# Altium PCB PCB_USB_ISOLATOR.PcbDoc
Units mm, origin at the board's own origin, x right, y up, seen from the top; angles counter-clockwise.
Board outline 66.68 x 24.66 mm, 2 copper layers (Top Layer, Bottom Layer); 30 components, 17 nets, 183 pads, 0 vias.
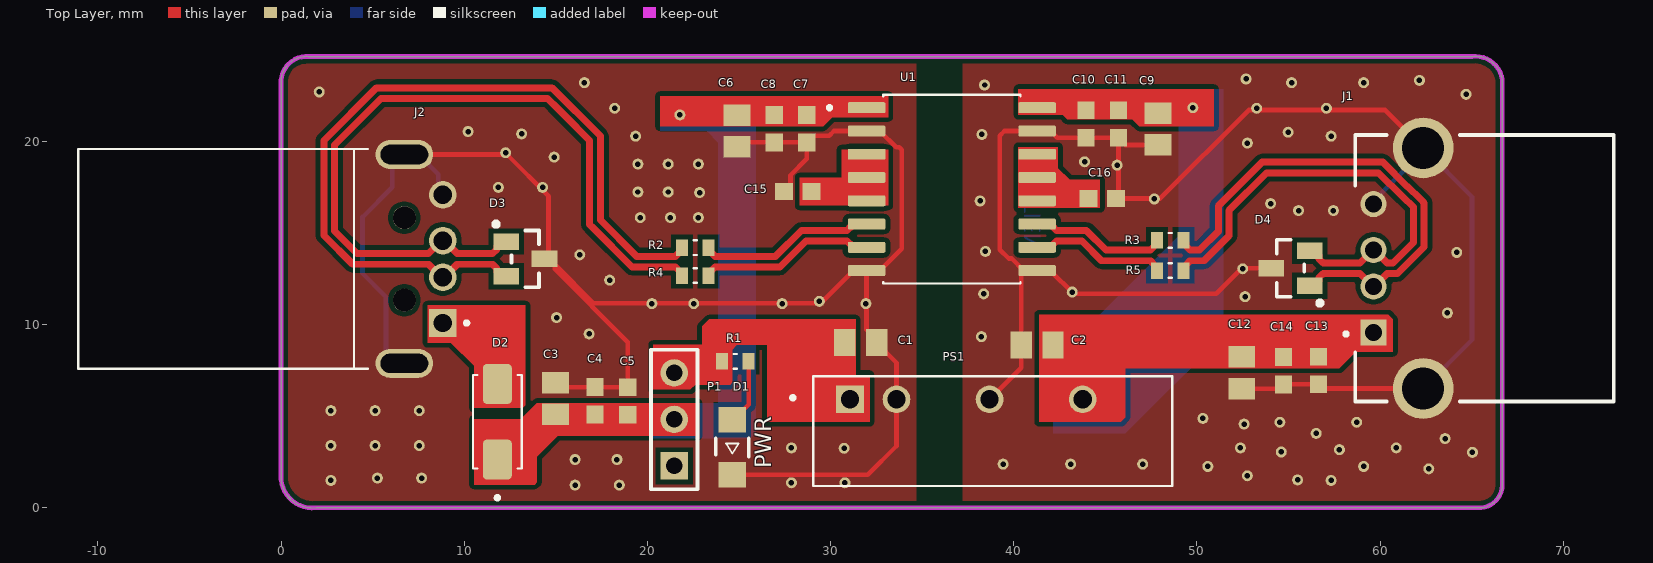
[diagram p0: Top Layer view]
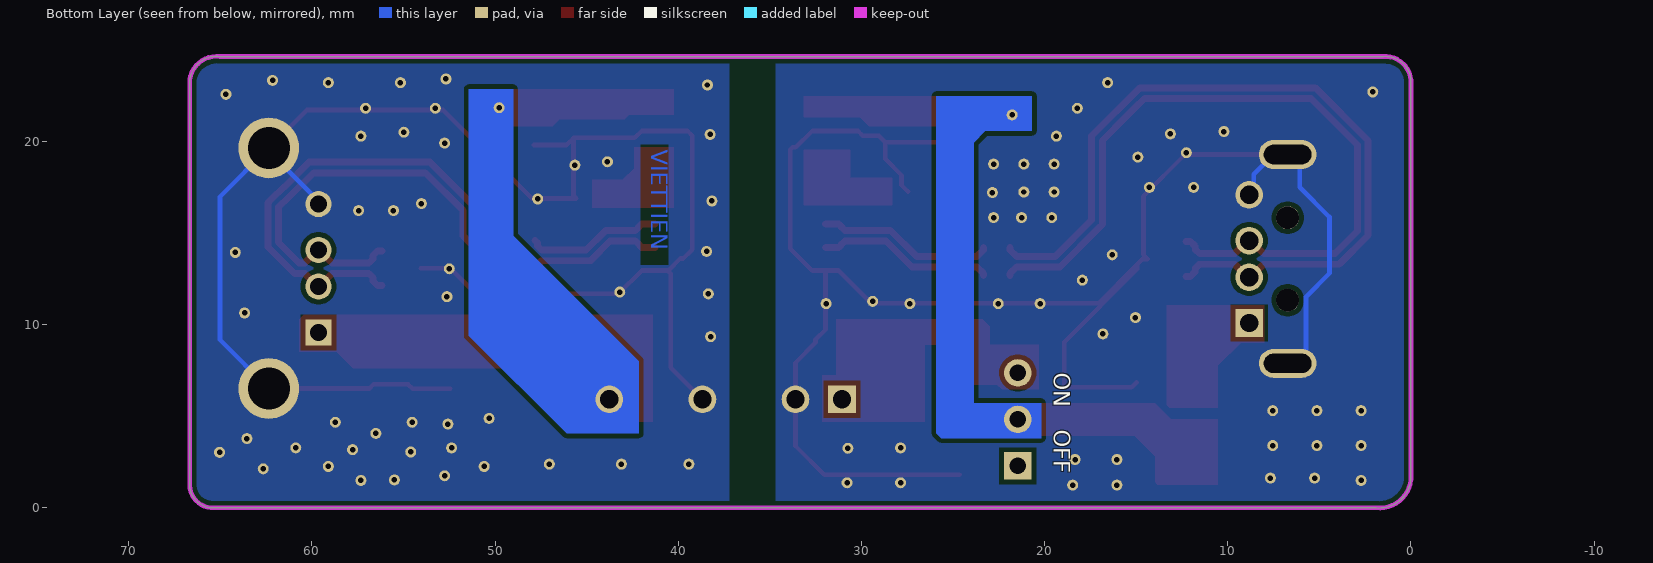
[diagram p1: Bottom Layer view, seen from below]
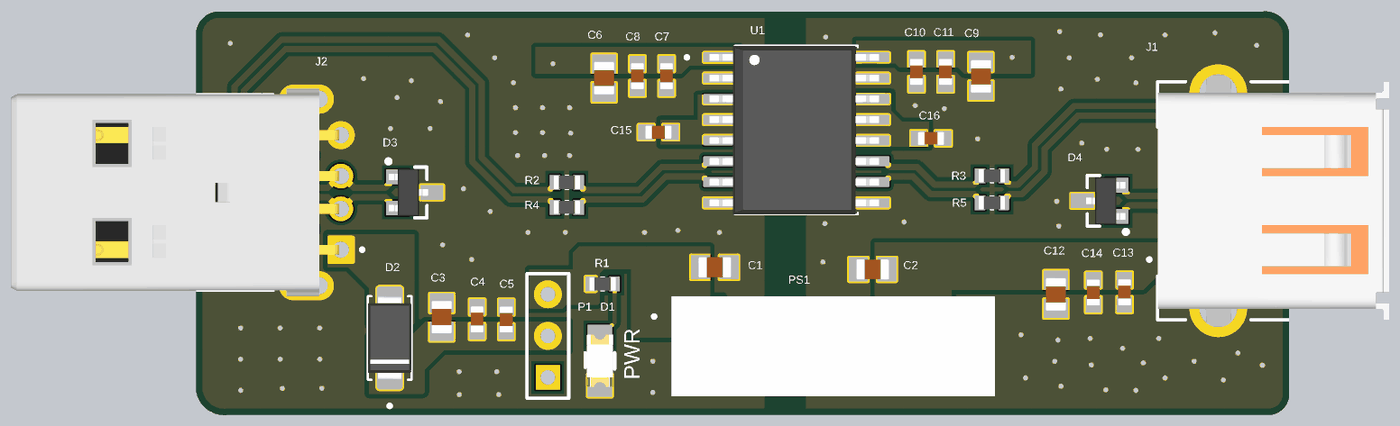
[diagram p2: 3D render of the assembled board from above, using the file's embedded part models]

## Layer stack, top to bottom
Top Solder: solder mask 0.0102, Solder Resist, Dk 3.5
Top Layer: signal copper 0.0356
Dielectric 1: dielectric 0.32, FR-4, Dk 4.8
Bottom Layer: signal copper 0.0356
Bottom Solder: solder mask 0.0102, Solder Resist, Dk 3.5

## Board outline
0,1.524 0,23.368 cw(c1.397,23.241) 1.524,24.638 65.024,24.638 cw(c65.214,23.177) 66.675,23.368 66.675,1.397 cw(c65.405,1.27) 65.532,0 1.905,0 cw(c1.714,1.714)

## Design rules (kind name [scope] priority, off if disabled: settings)
Clearance [All] p1: gap=0.254 ignorepadtopadclearanceinfootprint=FALSE except(0: Arc-Hole Track-Hole SMDPad-Hole THPad-Hole Via-Hole Fill-Hole Poly-Hole Region-Hole Text-Hole; 0.154: Arc-Arc Arc-Track Track-Track)
DiffPairsRouting [All] p1: maxlimit=0.5 minlimit=0.15 mostfreqgap=0.2 toplayer_minwidth=0.15 toplayer_maxwidth=0.389 toplayer_prefwidth=0.389 bottomlayer_minwidth=0.15 bottomlayer_maxwidth=0.389 bottomlayer_prefwidth=0.389 impedanceprofiledriven=TRUE impedanceprofileid={421DD26A-4B10-4B7B-B98A-467E2CAEE926} impedanceprofilevalue=90.000000 maxuncoupledlength=12.7
PolygonConnect [All] p1: connectstyle=Direct reliefconductorwidth=0.254 reliefentries=4 polygonreliefangle="90 Angle" airgapwidth=0.254
RoutingVias [All] p1: holewidth=0.711 width=1.27 viastyle="Through Hole" minholewidth=0.711 minwidth=1.27 maxholewidth=0.711 maxwidth=1.27
SolderMaskExpansion [All] p1: expansion=0.102 istentingtop=FALSE
Width [All] p1: maxlimit=0.254 minlimit=0.254 preferedwidth=0.254
29 further rules are at their usual default settings.

## Classes and differential pairs
differential pair USB_UP_D: +USB_UP_D_P -USB_UP_D_N
differential pair USB_DW_D: +USB_DW_D_P -USB_DW_D_N
differential pair UP_D: +UP_D_P -UP_D_N
differential pair DW_D: +DW_D_P -DW_D_N

## Components (designator, comment, footprint, x,y, rotation, side; value= is the part's Value field where it differs from the comment)
C1 "1uF" CAPC2012X145N 31.641,9.017 r180 top
C2 "1uF" CAPC2012X145N 41.275,8.89 r0 top
C3 "1uF" CAPC2012X145N 14.986,5.969 r90 top
C4 "0.1uF" CAPC1608X94N 17.145,5.842 r90 top
C5 "10uF" CAPC1608X94N 18.923,5.83 r90 top
C6 "1uF" CAPC2012X145N 24.892,20.574 r270 top
C7 "0.1uF" CAPC1608X94N 28.702,20.701 r270 top
C8 "10uF" CAPC1608X94N 26.924,20.701 r270 top
C9 "1uF" CAPC2012X145N 47.879,20.683 r270 top
C10 "0.1uF" CAPC1608X94N 43.942,20.955 r270 top
C11 "10uF" CAPC1608X94N 45.72,20.955 r270 top
C12 "1uF" CAPC2012X145N 52.451,7.366 r270 top
C13 "0.1uF" CAPC1608X94N 56.642,7.493 r270 top
C14 "10uF" CAPC1608X94N 54.737,7.481 r270 top
C15 "0.1uF" CAPC1608X94N 28.206,17.272 r180 top
C16 "0.1uF" CAPC1608X94N 44.831,16.891 r180 top
D1 "Blue" WL-SMCW_1206 24.638,3.302 r90 top
D2 "B340A-E3/61T" DIOM5126X229N 11.811,4.699 r90 top
D3 "824022" WE-TVS_SOT23-3L 13.335,13.589 r270 top
D4 "824022" WE-TVS_SOT23-3L 55.118,13.081 r90 top
J1 "USBR-A-S-S-O-TH" SAMTEC_USBR-A-S-S-O-TH 62.357,13.081 r90 top
J2 "type_A_2-0_48037-0001" MOLEX_48037-0001 6.731,13.589 r270 top
P1 "Header 3" HDR1X3 21.463,2.286 r90 top
PS1 "B0505LS-1WR3" CONV_RFB-0505S 38.862,4.191 r0 top
R1 "10K" RES_ERJU03J474V 24.802,8.001 r0 top
R2 "24E" RES_ERJU03J474V 22.616,14.205 r0 top
R3 "24E" RES_ERJU03J474V 48.551,14.605 r0 top
R4 "24E" RES_ERJU03J474V 22.616,12.681 r0 top
R5 "24E" RES_ERJU03J474V 48.551,12.954 r0 top
U1 "ADUM4160BRWZ-RL" SOIC127P1032X265-16N 36.62,17.399 r0 top

## Footprints (in the part's own frame and the unit in brackets; to place one, negate y for a bottom-side part, rotate by r counter-clockwise, add the part's x,y. Pads: shape width x height; smd on the part's side, far side on the other; paste and mask are expansions set on the pad)
CAPC1608X94N [mm]
  rect 0.97x0.94 smd paste+0 mask+0.102: 1(-0.75,0) 2(0.75,0)
  body extent -0.8,-0.4 0.8,0.4, height 0.94
CAPC2012X145N [mm]
  rect 1.17x1.47 smd: 1(-0.871,0) 2(0.871,0)
  body extent -1,-0.63 1,0.63, height 1.45
CONV_RFB-0505S [mm]
  rect 1.508x1.508 / inner round 1.508 / far side rect 1.508x1.508 hole 1: 1(-7.8,1.73)
  round 1.508 hole 1: 2(-5.26,1.73) 4(-0.18,1.73) 6(4.9,1.73)
  silkscreen extent -11.02,-3 9.8,3, body extent -9.8,-3 9.8,3, height 9.7
DIOM5126X229N [mm]
  rrect25% 2.17x1.57 smd: A(2.065,0) C(-2.065,0)
  silkscreen extent -4.25,-1.33 2.55,1.33, body extent -2.55,-1.33 2.55,1.33, height 2.29
HDR1X3 [mm] "Connector; Header; 3 Position"
  rect 1.5x1.5 hole 0.9: 1(0,0)
  round 1.5 hole 0.9: 2(2.54,0) 3(5.08,0)
  silkscreen extent -1.27,-1.27 6.35,1.27
MOLEX_48037-0001 [mm]
  rect 1.508x1.508 hole 1: 1(3.5,2.1)
  round 1.508 hole 1: 2(1,2.1) 3(-1,2.1) 4(-3.5,2.1)
  oval 1.575x3.15 hole 1.05 slot 2.6 at 90 deg: S1(5.7,0) S2(-5.7,0)
  round 1.25 hole 1.25 unplated: ""(-2.25,0) ""(2.25,0)
  silkscreen extent -6,-17.8 6,3.5, body extent -6.35,-18.01 6.35,2.01, height 4.54
RES_ERJU03J474V [mm]
  rect 0.65x0.9 smd: 1(-0.725,0) 2(0.725,0)
  silkscreen extent -0.08,-0.4 0.08,0.4, body extent -0.8,-0.4 0.8,0.4, height 0.45
SAMTEC_USBR-A-S-S-O-TH [mm]
  rect 1.428x1.428 hole 0.92: 1(-3.5,2.71)
  round 1.428 hole 0.92: 2(-1,2.71) 3(1,2.71) 4(3.5,2.71)
  round 3.316 hole 2.3: S1(-6.57,0) S2(6.57,0)
  silkscreen extent -7.27,-10.4 7.27,4.31, body extent -7.85,-10.42 7.85,3.68, height 7.77
SOIC127P1032X265-16N [mm]
  rrect25% 2.05x0.6 smd paste+0 mask+0.102: 1(-4.655,4.445) 2(-4.655,3.175) 3(-4.655,1.905) 4(-4.655,0.635) 5(-4.655,-0.635) 6(-4.655,-1.905) 7(-4.655,-3.175) 8(-4.655,-4.445) 9(4.655,-4.445) 10(4.655,-3.175) 11(4.655,-1.905) 12(4.655,-0.635) 13(4.655,0.635) 14(4.655,1.905) 15(4.655,3.175) 16(4.655,4.445)
  silkscreen extent -6.78,-5.15 3.75,5.15, body extent -5.29,-5.15 5.04,5.15, height 2.65
WE-TVS_SOT23-3L [mm]
  rect 0.9x1.4 smd paste+0 mask+0.102: 1(-0.95,-1.05) 2(0.95,-1.05) 3(0,1.05)
  silkscreen extent -2,-1.7 1.55,0.75, body extent -1.45,-1.58 1.45,0.82, height 1.04
WL-SMCW_1206 [mm]
  rect 1.4x1.5 smd: 1(-1.5,0) 2(1.5,0)
  silkscreen extent -0.5,-0.9 0.5,0.9, body extent -1.6,-0.8 1.6,0.8, height 0.68

## Part data
C1 C2 C3 C6 C9 C12: library part cap_0805_VJ0805A681KXCAP, "CAP  0805", Package="2012 Vishay Vitramon", Check_prices=https://www.snapeda.com/parts/VJ0805A681KXCAP/Vishay/view-part/?ref=eda, MF="Vishay Vitramon", MP=VJ0805A681KXCAP, SnapEDA_Link=https://www.snapeda.com/parts/VJ0805A681KXCAP/Vishay/view-part/?ref=snap
C4 C5 C7 C8 C10 C11 C13 C14 C15 C16: library part cap_0603_VJ0603D3R9DXCAP, "cap 0603 (1608 Metric)", Package="1608 Vishay Vitramon", Check_prices=https://www.snapeda.com/parts/VJ0603D3R9DXCAP/Vishay/view-part/?ref=eda, MF="Vishay Vitramon", MP=VJ0603D3R9DXCAP, SnapEDA_Link=https://www.snapeda.com/parts/VJ0603D3R9DXCAP/Vishay/view-part/?ref=snap
D1: library part WL-SMCW_1206, "1206, Blue Typ.(@20mA): 470nm, 145mcd, 3.2V, 140Â° InGaN", Package="1206 Wurth Electronics", Check_prices=https://www.snapeda.com/parts/150120BS75000/Wurth+Electronics/view-part/?ref=eda, MF="Wurth Electronics", MP=150120BS75000, SnapEDA_Link=https://www.snapeda.com/parts/150120BS75000/Wurth+Electronics/view-part/?ref=snap
D2: "Diode Schottky 40 V 3A Surface Mount DO-214AC (SMA)", Package="DO-214 Vishay Semiconductor", Check_prices=https://www.snapeda.com/parts/B340A-E3/61T/Vishay/view-part/?ref=eda, MF="Vishay Semiconductor", MP=B340A-E3/61T, SnapEDA_Link=https://www.snapeda.com/parts/B340A-E3/61T/Vishay/view-part/?ref=snap
D3 D4: "8V Clamp 8A (8/20µs) Ipp Tvs Diode Surface Mount SOT-23-3L,  / WE-TVS_SOT23-3L_824022,  / 824022", Package=None, Availability=Unavailable, MF="{'manufacturer': u'W\xfcrth Elektronik'}", MP=824022, Price=None
J1: "USB-A _USB TYPE-A_ USB 2.0 Receptacle Connector 4 Position Through Hole, Right Angle", Package=None, Availability=Unavailable, MF=Samtec, MP=USBR-A-S-S-O-TH, Price=None, SnapEDA_Link=https://www.snapeda.com/parts/USBR-A-S-S-O-TH/Samtec%20Inc./view-part/279681/?ref=snap
J2: "USB-A _USB TYPE-A_ USB 2.0 Plug Connector 4 Position Through Hole, Right Angle / 48037-0001", Package=None, Availability=Unavailable, MF=Molex, MP=48037-0001, Price=None, SnapEDA_Link=https://www.snapeda.com/parts/48037-0001/Molex/view-part/49135/?ref=snap
P1: "Header, 3-Pin", LatestRevisionDate=17-Jul-2002, LatestRevisionNote="Re-released for DXP Platform.", Publisher="Altium Limited"
PS1: "1W DC/DC-Converter 'ECONOLINE' SIP7 1kV unreg", Package="SIP-6 Recom Power", Check_prices=https://www.snapeda.com/parts/RFB-0505S/Recom+Power/view-part/?ref=eda, MF="Recom Power", MP=RFB-0505S, SnapEDA_Link=https://www.snapeda.com/parts/RFB-0505S/Recom+Power/view-part/?ref=snap
R1 R2 R3 R4 R5: library part res_0603_ERJU03J474V, "0603 Anti-Sulfurated", Package="1608-2 Panasonic", Check_prices=https://www.snapeda.com/parts/ERJU03J474V/Panasonic/view-part/?ref=eda, MF=Panasonic, MP=ERJU03J474V, SnapEDA_Link=https://www.snapeda.com/parts/ERJU03J474V/Panasonic/view-part/?ref=snap

## Free pads (board coordinates)
  round 0.6 hole 0.3 mask+0.102: 2(2.084,22.704) 2(2.719,1.495) 2(2.719,3.4) 2(2.719,5.305) 2(5.132,3.4) 2(5.132,5.305) 2(5.259,1.622) 2(7.545,3.4) 2(7.545,5.305) 2(7.672,1.622) 2(10.212,20.545) 2(11.863,17.497) 2(12.259,19.387) 2(13.133,20.418) 2(14.276,17.497) 2(14.911,19.148) 2(15.038,10.385) 2(16.054,1.241) 2(16.054,2.638) 2(16.308,13.814) 2(16.562,23.212) 2(16.816,9.496) 2(17.94,12.43) 2(18.213,21.815) 2(18.34,2.638) 2(18.467,1.241) 2(19.356,20.291) 2(19.483,17.243) 2(19.483,18.767) 2(19.61,15.846) 2(20.245,11.147) 2(21.134,17.243) 2(21.134,18.767) 2(21.261,15.846) 2(21.772,21.455) 2(22.531,11.147) 2(22.785,15.846) 2(22.785,18.767) 2(22.851,17.213) 2(27.357,11.147) 2(27.865,1.368) 2(27.865,3.273) 2(29.387,11.274) 2(30.741,3.251) 2(30.786,1.368) 2(31.929,11.147) 2(38.165,16.753) 2(38.238,9.344) 2(38.263,20.385) 2(38.36,11.684) 2(38.406,23.085) 2(38.458,13.999) 2(39.422,2.384) 2(43.105,2.384) 2(43.195,11.782) 2(43.867,18.894) 2(45.645,18.708) 2(47.042,2.384) 2(47.677,16.862) 2(49.784,21.844) 2(50.328,4.883) 2(50.598,2.257) 2(52.376,3.273) 2(52.503,13.052) 2(52.578,4.572) 2(52.63,11.528) 2(52.684,23.414) 2(52.757,1.749) 2(52.757,19.91) 2(53.265,21.815) 2(54.027,16.608) 2(54.535,4.67) 2(54.61,3.048) 2(54.983,20.507) 2(55.17,23.212) 2(55.499,1.524) 2(55.551,16.227) 2(56.515,4.064) 2(57.075,21.815) 2(57.329,1.495) 2(57.329,20.291) 2(57.456,16.227) 2(57.785,3.175) 2(58.726,4.67) 2(59.107,2.257) 2(59.107,23.212) 2(60.885,3.273) 2(62.155,23.339) 2(62.663,2.13) 2(63.552,3.781) 2(63.679,10.639) 2(64.187,13.941) 2(64.695,22.577) 2(65.049,3.031)

## Nets (pads, with @x,y where several pads share a name; then routed paths per layer and width w, separated by ;. In a path a pad name is that pad's centre, name@x,y a point inside that pad or via, vN(x,y) a via of type N, cw(c..) or ccw(c..) an arc to the next point about the centre after c; other vN are vias at no path point)
DW_D_N: R3.1 U1.11 | length 7.5
  Top Layer w0.381: U1.11 42,15.494 42.11,15.385 42.11,15.373 42.333,15.149 43.961,15.149 45.04,14.07 47.468,14.07 47.691,14.293 47.691,14.47 R3.1
DW_D_P: R5.1 U1.10 | length 7.5
  Top Layer w0.381: U1.10 42,14.224 42.11,14.333 42.11,14.345 42.333,14.569 43.72,14.569 44.8,13.489 47.468,13.489 47.691,13.266 47.691,13.089 R5.1
GND: C1.1 C3.2 C4.2 C5.2 C6.2 C7.2 C8.2 C15.2 D1.1 D3.3 J2.4 J2.S1 J2.S2 pad.2@2.084,22.704 pad.2@2.719,1.495 pad.2@2.719,3.4 pad.2@2.719,5.305 pad.2@5.132,3.4 pad.2@5.132,5.305 pad.2@5.259,1.622 pad.2@7.545,3.4 pad.2@7.545,5.305 pad.2@7.672,1.622 pad.2@10.212,20.545 pad.2@11.863,17.497 pad.2@12.259,19.387 pad.2@13.133,20.418 pad.2@14.276,17.497 pad.2@14.911,19.148 pad.2@15.038,10.385 pad.2@16.054,1.241 pad.2@16.054,2.638 pad.2@16.308,13.814 pad.2@16.562,23.212 pad.2@16.816,9.496 pad.2@17.94,12.43 pad.2@18.34,2.638 pad.2@18.213,21.815 pad.2@18.467,1.241 pad.2@19.61,15.846 pad.2@19.356,20.291 pad.2@19.483,17.243 pad.2@19.483,18.767 pad.2@20.245,11.147 pad.2@21.134,17.243 pad.2@21.134,18.767 pad.2@21.261,15.846 pad.2@22.531,11.147 pad.2@22.785,15.846 pad.2@22.785,18.767 pad.2@22.851,17.213 pad.2@27.357,11.147 pad.2@27.865,1.368 pad.2@27.865,3.273 pad.2@29.387,11.274 pad.2@30.741,3.251 pad.2@30.786,1.368 pad.2@31.929,11.147 PS1.2 U1.2 U1.8 | length 101.8
  Top Layer w0.254: J2.S2 12.334,19.289 14.605,17.018 14.605,13.809 D3.3 14.635,13.589 D3.3@14.958,13.266 ; C3.2 15.234,6.592 C4.2 18.911,6.592 C5.2 18.923,9.051 14.958,13.016 D3.3@14.958,13.266 ; D1.1 32.028,1.802 33.602,3.376 PS1.2 33.602,7.927 C1.1 32.512,9.167 31.965,9.714 U1.8 ; C6.2 25.14,19.951 C8.2 C7.2 ; C15.2 27.471,17.272 27.814,17.615 27.814,18.16 28.702,19.048 C7.2 ; D3.3@14.958,13.266 17.048,11.176 29.462,11.176 31.24,12.954 U1.8 ; C7.2 28.702,19.966 29.045,20.309 29.923,20.309 30.188,20.574 U1.2 32.69,20.574 33.579,19.685 33.76,19.685 33.888,19.557 33.888,14.152 32.69,12.954 U1.8
  Bottom Layer w0.254: J2.S1 6.335,7.889 5.725,8.499 5.725,11.53 4.445,12.81 4.445,15.875 6.071,17.501 6.071,18.679 6.681,19.289 J2.S2 7.518,19.289 8.591,18.216 8.591,17.329 J2.4
ISO_5V0: C2.2 C9.1 C10.1 C11.1 C12.1 C13.1 C14.1 J1.1 pad.2@49.784,21.844 PS1.6 U1.16
ISO_GND: C2.1 C9.2 C10.2 C11.2 C12.2 C13.2 C14.2 C16.1 D4.3 J1.4 J1.S1 J1.S2 pad.2@38.36,11.684 pad.2@38.165,16.753 pad.2@38.238,9.344 pad.2@38.263,20.385 pad.2@38.406,23.085 pad.2@38.458,13.999 pad.2@39.422,2.384 pad.2@43.105,2.384 pad.2@43.195,11.782 pad.2@43.867,18.894 pad.2@45.645,18.708 pad.2@47.042,2.384 pad.2@47.677,16.862 pad.2@50.328,4.883 pad.2@50.598,2.257 pad.2@52.63,11.528 pad.2@52.376,3.273 pad.2@52.503,13.052 pad.2@52.578,4.572 pad.2@52.684,23.414 pad.2@52.757,1.749 pad.2@52.757,19.91 pad.2@53.265,21.815 pad.2@54.027,16.608 pad.2@54.61,3.048 pad.2@54.535,4.67 pad.2@54.983,20.507 pad.2@55.17,23.212 pad.2@55.499,1.524 pad.2@55.551,16.227 pad.2@56.515,4.064 pad.2@57.075,21.815 pad.2@57.329,1.495 pad.2@57.329,20.291 pad.2@57.456,16.227 pad.2@57.785,3.175 pad.2@58.726,4.67 pad.2@59.107,2.257 pad.2@59.107,23.212 pad.2@60.885,3.273 pad.2@62.155,23.339 pad.2@62.663,2.13 pad.2@63.552,3.781 pad.2@63.679,10.639 pad.2@64.187,13.941 pad.2@64.695,22.577 pad.2@65.049,3.031 PS1.4 U1.9 U1.15 | length 92.1
  Top Layer w0.254: PS1.4 40.404,7.643 C2.1 40.404,12.781 U1.9@40.577,12.954 ; C9.2 46.098,19.812 C11.2@45.72,20.19 ; C12.2 54.501,6.495 C14.2 54.749,6.743 C13.2 56.874,6.511 J1.S1 ; D4.3 52.451,13.081 51.054,11.684 43.27,11.684 42,12.954 U1.9 U1.9@40.577,12.954 ; J1.S2 60.291,21.717 52.832,21.717 48.006,16.891 C16.1 45.72,17.03 C11.2@45.72,20.19 ; U1.9@40.577,12.954 40.55,12.954 39.892,13.612 39.728,13.612 39.243,14.097 39.243,20.32 39.497,20.574 U1.15 42,20.574 42.369,20.205 C10.2 C11.2 C11.2@45.72,20.19
  Bottom Layer w0.254: J1.4 59.647,16.761 62.357,19.471 J1.S2 65.024,16.984 65.024,9.178 J1.S1
NetC1_2: C1.2 P1.3 PS1.1 R1.1
NetC15_1: C15.1 U1.3 U1.4 U1.5
NetC16_2: C16.2 U1.12 U1.13 U1.14 | length 2.9
  Top Layer w0.254: U1.12 43.954,16.764 C16.2
NetD1_2: D1.2 R1.2 | length 3.6
  Top Layer w0.254: D1.2 24.688,4.802 25.527,5.641 R1.2
NetD2_A: D2.A J2.1
UP_D_N: R2.2 U1.6 | length 9.6
  Top Layer w0.381: R2.2 23.341,14.08 23.687,13.734 26.995,13.734 28.411,15.149 30.907,15.149 31.13,15.373 31.13,15.385 31.24,15.494 U1.6
UP_D_P: R4.2 U1.7 | length 9.6
  Top Layer w0.381: R4.2 23.341,12.806 23.687,13.153 27.236,13.153 28.651,14.569 30.907,14.569 31.13,14.345 31.13,14.333 31.24,14.224 U1.7
USB_DW_D_N: D4.1 J1.2 R3.2 | length 27.4
  Top Layer w0.381: R3.2 49.411,14.47 49.411,14.293 49.634,14.07 50.145,14.07 51.17,15.095 51.17,16.485 53.553,18.869 60.164,18.869 61.485,17.548 61.505,17.548 62.229,16.825 62.399,16.654 62.399,14.24 60.95,12.791 60.394,12.791 59.684,12.081 J1.2 59.61,12.081 58.9,12.791 56.901,12.791 56.678,12.567 56.678,12.391 56.418,12.131 D4.1
USB_DW_D_P: D4.2 J1.3 R5.2 | length 25.5
  Top Layer w0.381: R5.2 49.411,13.089 49.411,13.266 49.634,13.489 50.385,13.489 51.751,14.854 51.751,16.245 53.794,18.288 59.924,18.288 61.244,16.967 61.265,16.967 61.818,16.414 61.818,14.48 60.709,13.371 60.394,13.371 59.684,14.081 J1.3 59.61,14.081 58.9,13.371 56.901,13.371 56.678,13.595 56.678,13.771 56.418,14.031 D4.2
USB_UP_D_N: D3.2 J2.2 R2.1 | length 44.3
  Top Layer w0.381: D3.2 12.035,12.639 11.775,12.899 11.775,13.075 11.552,13.299 9.618,13.299 8.908,12.589 J2.2 8.754,12.589 8.044,13.299 3.914,13.299 2.34,14.872 2.34,20.053 5.22,22.933 14.786,22.933 17.429,20.29 17.429,15.705 19.4,13.734 21.545,13.734 21.891,14.08 R2.1
USB_UP_D_P: D3.1 J2.3 R4.1 | length 42.3
  Top Layer w0.381: D3.1 12.035,14.539 11.775,14.279 11.775,14.103 11.552,13.879 9.618,13.879 8.908,14.589 J2.3 8.754,14.589 8.044,13.879 4.155,13.879 2.921,15.113 2.921,19.812 5.461,22.352 14.545,22.352 15.106,21.791 15.464,21.433 16.848,20.05 16.848,15.464 17.018,15.294 19.159,13.153 21.545,13.153 21.891,12.806 R4.1
VBUS_5V0: C3.1 C4.1 C5.1 C6.1 C7.1 C8.1 D2.C P1.2 pad.2@21.772,21.455 U1.1
pads on no net: J2. P1.1

## Polygon pours and split planes (outlines as drawn)
ISO_GND on Bottom Layer "NONET_L-01_P-001" (solid, remove dead copper, pour order 1): 37.211,0 37.211,24.638 66.675,24.638 66.675,0
GND on Bottom Layer "NONET_L-01_P-001" (solid, remove dead copper, pour order 0): 34.671,24.765 34.671,0 -0.127,0 -0.127,24.765
ISO_GND on Top Layer "NONET_L-01_P-001" (solid, remove dead copper, pour order 3): 37.211,24.638 37.211,0 66.675,0 66.675,24.638
GND on Top Layer "NONET_L-01_P-001" (solid, remove dead copper, pour order 2): 0,24.638 34.671,24.638 34.671,0 0,0

## Keep-outs
Keep-Out Layer:
  the board outline again, w0.254

## Other copper
Top Layer:
  region net ISO_5V0: 41.402,4.699 45.847,4.699 46.101,4.953 46.101,7.62 57.785,7.62 58.674,8.509 60.706,8.509 60.706,10.287 60.452,10.541 41.402,10.541
  region net NetC16_2: 40.259,19.685 40.259,16.383 44.704,16.383 44.704,17.907 43.053,17.907 42.418,18.542 42.418,19.685
  region net ISO_5V0: 40.259,22.86 50.927,22.86 50.927,20.828 46.863,20.828 46.482,21.209 42.926,21.209 42.672,21.463 40.259,21.463
  region net NetC1_2: 28.829,7.239 32.131,7.239 32.131,4.699 28.829,4.699
  region net VBUS_5V0: 10.541,4.826 13.081,4.826 13.97,5.715 22.733,5.715 22.733,3.937 15.113,3.937 13.97,2.794 13.97,1.397 13.843,1.27 10.541,1.27
  region net NetD2_A: 8.001,11.049 13.335,11.049 13.335,5.588 13.208,5.461 10.541,5.461 10.541,7.747 9.271,9.017 8.001,9.017
  region net NetC1_2: 22.606,6.731 22.352,6.477 20.32,6.477 20.32,8.89 22.987,8.89 22.987,9.906 23.368,10.287 31.369,10.287 31.369,4.699 26.543,4.699 26.543,8.89 24.892,8.89 24.638,8.636 24.638,6.858 24.511,6.731
  region net VBUS_5V0: 20.701,22.479 33.147,22.479 33.147,21.336 30.099,21.336 29.591,20.828 20.701,20.828
  region net NetC15_1: 28.321,18.034 28.321,16.51 32.893,16.51 32.893,18.034
  region net NetC15_1: 30.607,19.558 30.607,16.51 33.147,16.51 33.147,19.558
Bottom Layer:
  region net VBUS_5V0: 20.193,5.715 23.876,5.715 23.876,19.939 23.241,20.574 20.701,20.574 20.701,22.479 25.908,22.479 25.908,4.064 25.654,3.81 20.193,3.81
  region net ISO_5V0: 49.022,22.86 49.022,14.859 42.164,8.001 42.164,4.064 46.101,4.064 51.435,9.398 51.435,22.86
  text "VIETTIEN" at 41.783,19.557 h1.52 r90

## Silkscreen, mask and mechanical layers (free items; w line width, h text height)
Top Overlay:
  text "PWR" at 27.051,2.159 h1.52 r90
Bottom Overlay:
  text "ON" at 19.795,7.366 h1.52 r90
  text "OFF" at 19.795,4.27 h1.52 r90